# Altium PCB PCI Express_16765X6890_64PIN_Low profile_Clear.PCBDOC (part 9 of 9)
Units mm, origin at the board's own origin, x right, y up, seen from the top; angles counter-clockwise.
Board outline 80.71 x 137.84 mm, 6 copper layers (Top Layer, Layer 2 (GND), Layer 3, Layer 4, Layer 5 (AGND), Bottom Layer), stack 1.571 mm thick; 507 components, 297 nets, 1544 pads, 616 vias.
Unrouted connection lines stored in the file: 101.
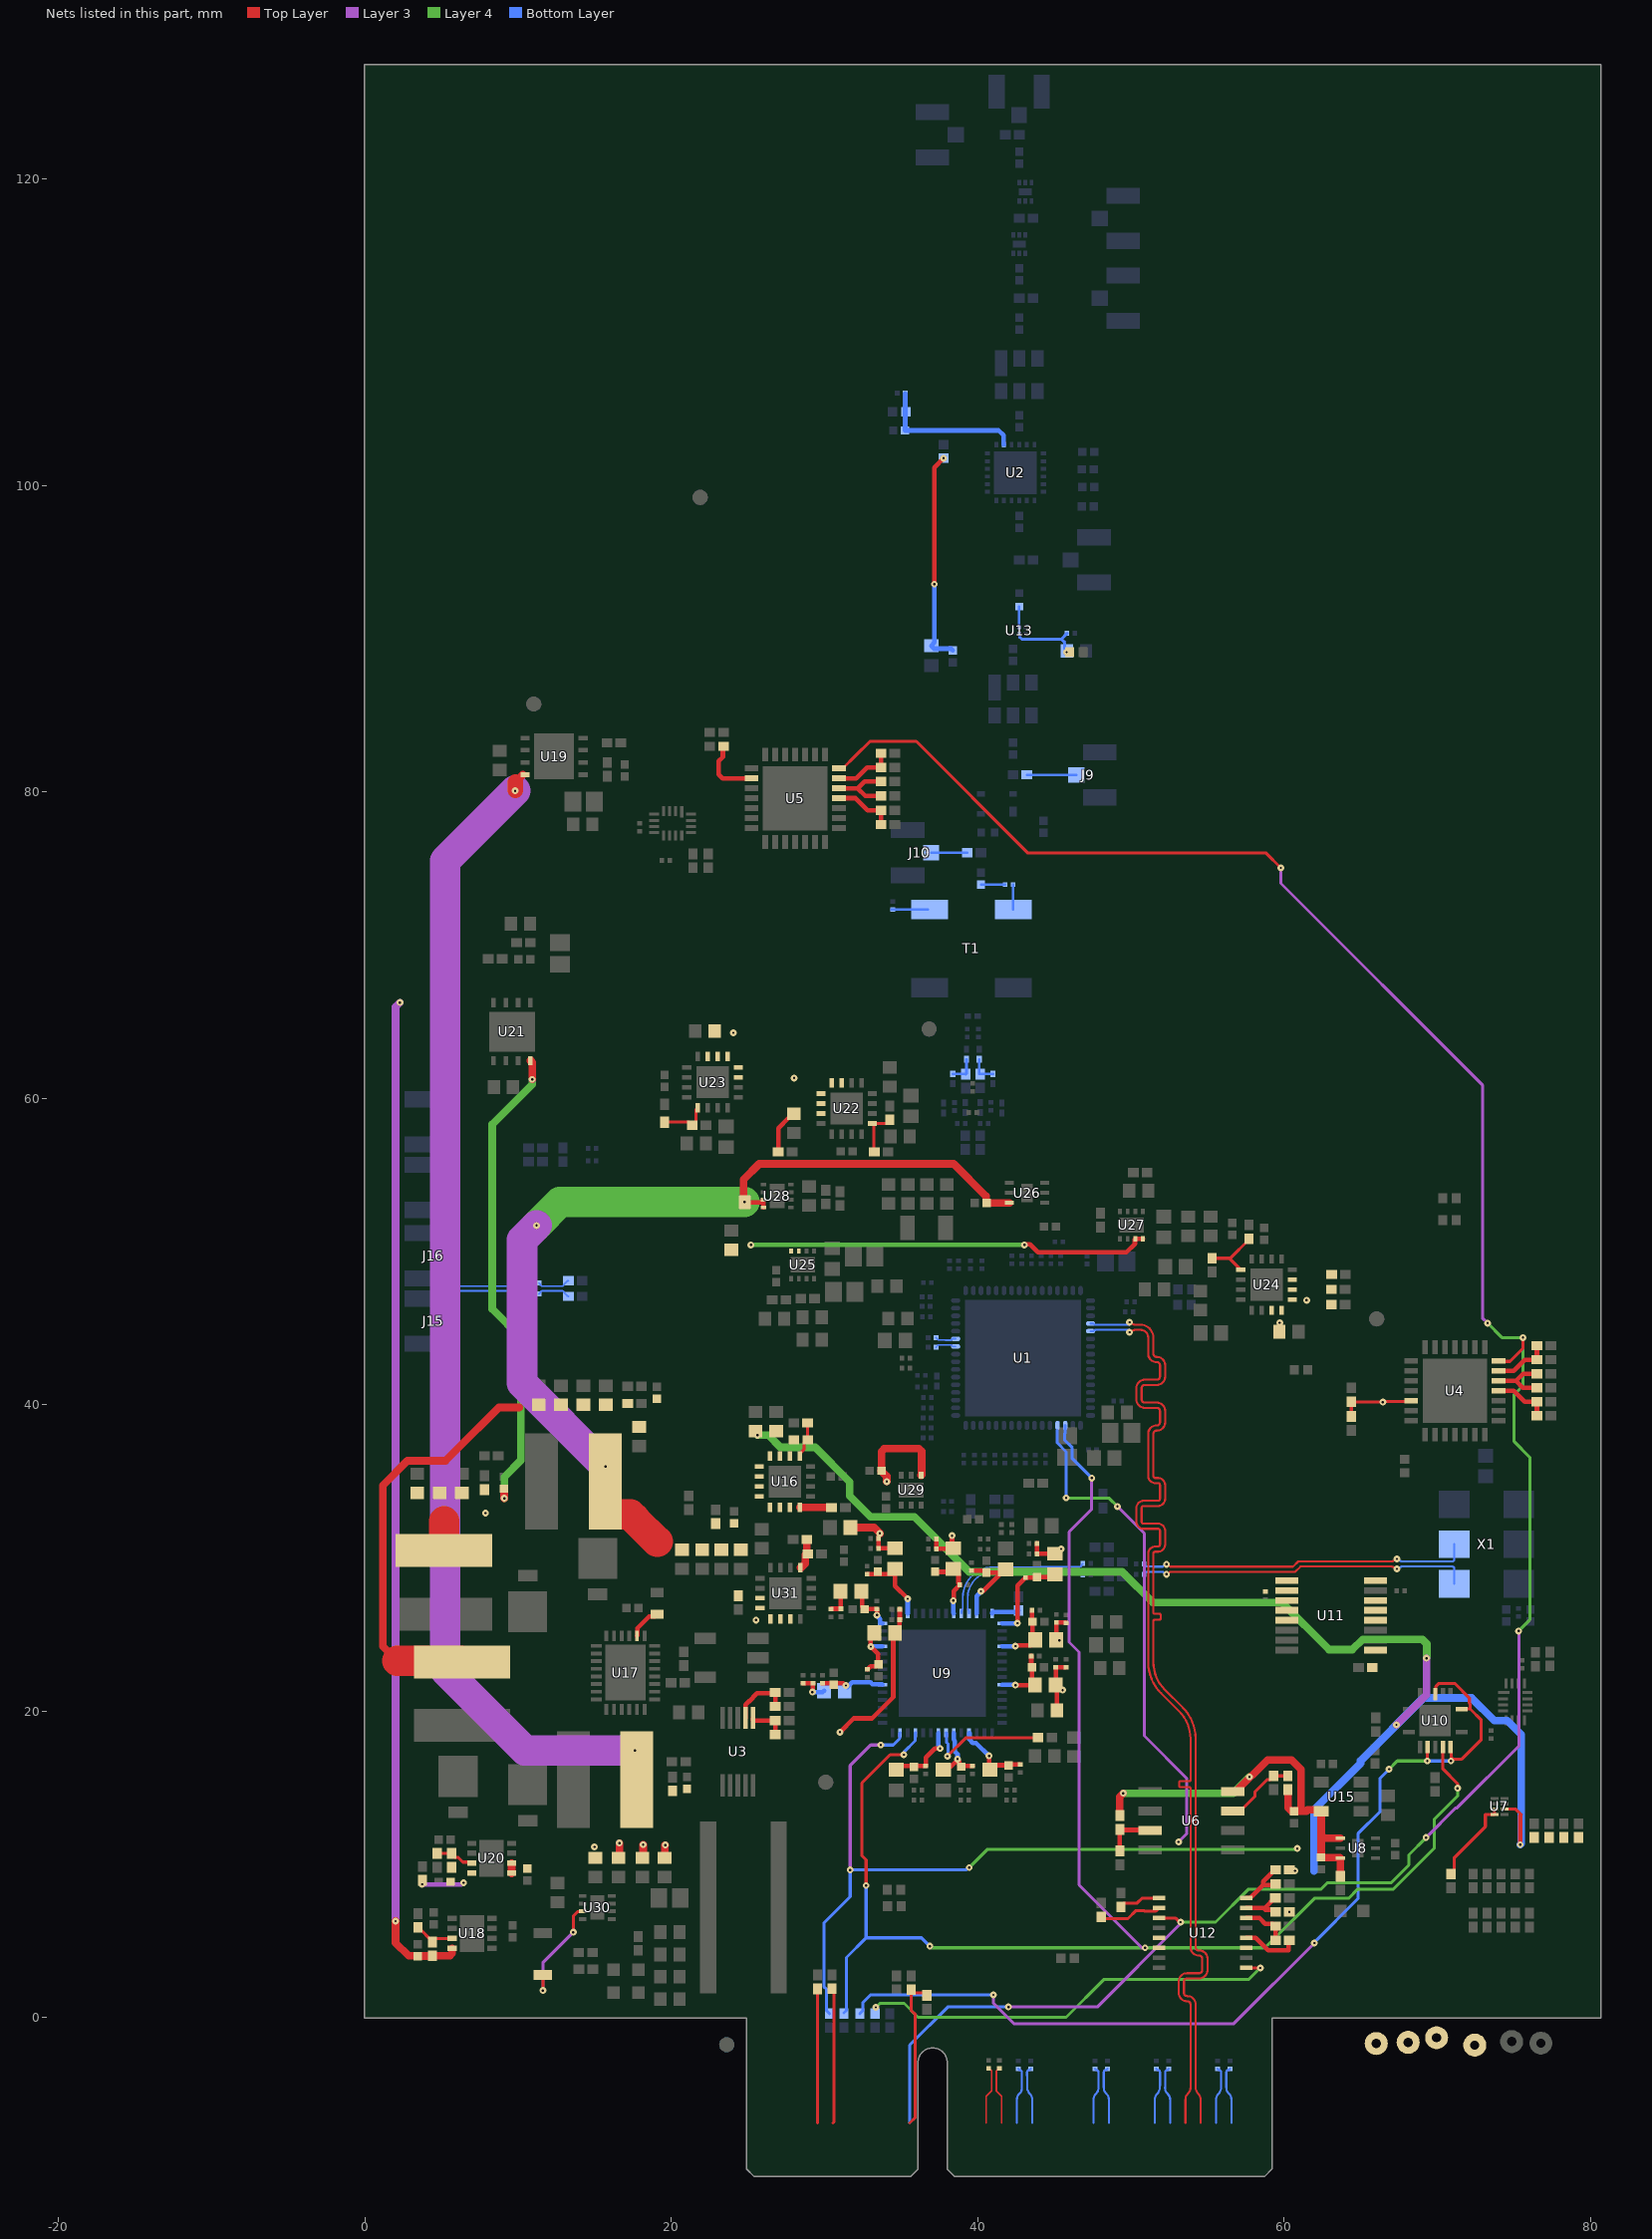
[diagram p7: the nets of this part, all layers, seen from the top]

## Via types
v1: diameter 0.45, hole 0.15, Top Layer to Bottom Layer, 469 vias
v2: diameter 0.5, hole 0.2, Top Layer to Bottom Layer, 128 vias
v3: diameter 0.475, hole 0.15, Top Layer to Bottom Layer, 15 vias
v4: diameter 5, hole 3, Top Layer to Bottom Layer, 3 vias
v5: diameter 0.6, hole 0.2, Top Layer to Bottom Layer, 1 vias

## Nets (pads, with @x,y where several pads share a name; then routed paths per layer and width w, separated by ;. In a path a pad name is that pad's centre, name@x,y a point inside that pad or via, vN(x,y) a via of type N, cw(c..) or ccw(c..) an arc to the next point about the centre after c; other vN are vias at no path point) (continued)
NetJ9_2: J9.2 R44.1 | length 3.2
  Bottom Layer w0.165: R44.1@43.209,81.102 J9.2@46.442,81.102
NetJ10_2: J10.2 R49.1 | length 2.4
  Bottom Layer w0.165: J10.2@36.965,76.022 R49.1@39.317,76.022
NetL1_1: L1.1 U13.5 | length 1.3
  Bottom Layer w0.165: U13.5@42.709,90.736 L1.1@42.709,92.075
NetL4_2: L4.2 U17.24 | length 2.2
  Top Layer w0.3: U17.24@17.76,24.905 17.785,24.93 17.785,25.405 18.555,26.175 18.917,26.175 L4.2@19.067,26.325
NetL9_1: L9.1 U30.7 | length 7.4
  Top Layer w0.2: v1(11.619,1.754) 11.619,2.64 L9.1@11.654,2.674 ; v1(13.605,5.561) 13.605,6.615 13.89,6.9 14.189,6.9 U30.7@14.214,6.925
  Layer 3 w0.2: v1(11.619,1.754) 11.619,3.576 v1(13.605,5.561)
NetR1_2: R1.2 R2.1 R5.2 | length 1.9
  Bottom Layer w0.165: R5.2@38.379,61.59 39.19,61.59 cw(c39.19,61.562) R2.1@39.218,61.562 ccw(c39.218,61.613) 39.268,61.613 R1.2@39.268,62.54
NetR9_1: R9.1 R10.2 R11.1 | length 1.8
  Bottom Layer w0.165: R10.2@40.107,62.54 40.107,61.62 ccw(c40.157,61.62) R11.1@40.157,61.57 cw(c40.178,61.57) 40.178,61.59 R9.1@40.996,61.59
NetR16_1: R16.1 U7.7 U7.8 | length 5.7
  Top Layer w0.2: R16.1@70.891,9.365 71.091,9.565 71.091,10.407 73.138,12.453 73.138,13.245 U7.8@73.727,13.245 U7.7@73.727,13.545
NetR20_2: R20.2 R27.1 U6.7 | length 4.7
  Top Layer w0.2: U6.7@56.652,13.474 57.127,13.474 58.106,14.453 58.106,14.737 58.885,15.516 59.109,15.516 59.309,15.716 R20.2@59.309,15.766 R27.1@60.249,15.766
NetR21_1: R21.1 R119.2 U6.3 | length 3.4
  Top Layer w0.3: R119.2@49.276,10.864 R21.1@49.276,12.275 49.312,12.24 51.216,12.24 U6.3@51.252,12.204
NetR30_2: R30.2 U5.23 | length 4.3
  Top Layer w0.2: R30.2@23.412,82.956 R30.2@23.441,82.986
  Top Layer w0.3: R30.2@23.412,82.956 23.368,82.913 23.368,82.271 23.089,81.991 23.089,81.128 23.339,80.878 U5.23@25.234,80.878
NetR50_1: R50.1 R51.2 U16.9 | length 2.4
  Top Layer w0.2: U16.9@28.383,36.646 28.383,36.796 28.655,37.068 28.655,37.494 28.855,37.694 R50.1@28.905,37.694 28.905,38.804 R51.2@28.898,38.811
NetR65_1: R65.1 R66.2 U22.9 | length 3.2
  Top Layer w0.2: R66.2@33.245,56.499 33.214,56.529 33.214,58.249 U22.9@33.114,58.349 34.029,58.349 R65.1@34.27,58.59
NetR67_1: R67.1 R68.2 U23.9 | length 3.2
  Top Layer w0.2: R68.2@19.562,58.438 19.565,58.435 21.165,58.435 R67.1@21.365,58.235 21.415,58.235 21.615,58.435 21.615,59.264 U23.9@21.717,59.366
NetR69_1: R69.1 R70.2 U24.9 | length 4
  Top Layer w0.2: R69.1@55.296,49.548 56.432,49.548 ; U24.9@57.177,48.803 56.432,49.548 ; R70.2@57.709,50.825 57.709,50.775 56.482,49.548 56.432,49.548
NetR77_2: R77.2 U9.42 | length 1.8
  Bottom Layer w0.3: U9.42@40.937,26.372 40.937,26.435 40.967,26.465 42.579,26.465 R77.2@42.672,26.557
NetR78_2: R78.2 U9.7 | length 8
  Top Layer w0.2: v1(38.024,17.043) 39.243,18.263 R78.2@43.942,18.263
  Bottom Layer w0.2: U9.7@37.937,18.572 37.957,18.552 37.957,17.976 38.066,17.866 38.066,17.086 v1(38.024,17.043)
NetR80_1: R80.1 R81.2 U18.7 | length 2.7
  Top Layer w0.2: R81.2@3.459,5.877 3.494,5.877 4.4,4.97 R80.1@4.4,4.954 ; R80.1@4.4,4.92 R80.1@4.4,4.954 ; U18.7@5.701,5.154 4.6,5.154 R80.1@4.4,4.954
NetR82_1: R82.1 R85.2 U20.7 | length 2.6
  Top Layer w0.2: R85.2@4.713,10.7 R82.1@5.658,10.7 5.658,10.65 5.858,10.45 6.083,10.45 6.396,10.137 6.899,10.137 U20.7@6.974,10.062
NetR86_1: R86.1 R88.2 U31.9 | length 2.1
  Top Layer w0.5: U31.9@28.432,29.361 28.482,29.361 28.754,29.633 28.754,30.201 28.804,30.251 28.854,30.251 28.851,30.255 28.851,31.188 R86.1@28.847,31.191
NetR111_2: R111.2 R129.1 U3.2 | length 4.1
  Top Layer w0.3: U3.2@24.845,19.548 24.845,20.418 25.05,20.623 25.068,20.623 25.603,21.158 26.735,21.158 R129.1@26.786,21.209 R111.2@26.786,20.295
NetR112_2: R112.2 R130.1 U3.1 | length 2.5
  Top Layer w0.3: U3.1@25.345,19.548 25.345,19.38 R130.1@26.786,19.38 R112.2@26.786,18.466
NetR113_1: R113.1 R118.2 U4.12 | length 4.3
  Top Layer w0.3: U4.12@73.995,41.544 75.134,41.544 ; R118.2@76.505,41.097 75.581,41.097 75.134,41.544 ; R113.1@76.505,42.012 75.602,42.012 75.134,41.544
NetR114_1: R114.1 R116.2 U4.13 | length 3.7
  Top Layer w0.3: U4.13@73.995,42.194 74.992,42.194 75.705,42.907 76.486,42.907 R116.2@76.505,42.926 R114.1@76.505,43.84
NetR115_1: R115.1 R117.2 U4.11 | length 3.7
  Top Layer w0.3: U4.11@73.995,40.894 75.002,40.894 75.705,40.191 76.496,40.191 R115.1@76.505,40.183 R117.2@76.505,39.268
NetR120_2: R120.2 R123.1 U5.11 | length 4
  Top Layer w0.3: U5.11@30.934,79.578 32.025,79.578 32.812,78.791 R120.2@33.688,78.791 R123.1@33.688,77.851
NetR121_2: R121.2 R125.1 U5.12 | length 4.7
  Top Layer w0.3: U5.12@30.934,80.228 32.17,80.228 ; R125.1@33.688,79.731 32.667,79.731 32.17,80.228 ; R121.2@33.688,80.67 32.613,80.67 32.17,80.228
NetR122_2: R122.2 R124.1 U5.13 | length 4
  Top Layer w0.3: U5.13@30.934,80.878 32.065,80.878 32.772,81.585 R124.1@33.688,81.585 R122.2@33.688,82.499
NetR136_1: R136.1 R137.2 U4.26 | length 4.9
  Top Layer w0.2: R137.2@64.389,39.218 R136.1@64.389,40.19 64.422,40.157 v1(66.446,40.157) 66.49,40.201 68.252,40.201 U4.26@68.295,40.244
NetR138_1: R138.1 R143.2 U12.14 | length 3.1
  Top Layer w0.3: U12.14@57.536,6.487 58.386,6.487 58.754,6.119 59.293,6.119 R143.2@59.443,5.969 R138.1@59.443,5.029
NetR139_1: R139.1 R142.2 U12.15 | length 3.1
  Top Layer w0.3: U12.15@57.536,7.137 58.649,7.137 58.753,7.033 ; R142.2@59.436,7.798 59.386,7.798 58.753,7.164 58.753,7.033 ; R139.1@59.443,6.883 59.293,7.033 58.753,7.033
NetR140_1: R140.1 R141.2 U12.16 | length 3.6
  Top Layer w0.3: U12.16@57.536,7.787 57.786,7.787 58.643,8.644 ; R141.2@59.443,8.712 59.375,8.644 58.643,8.644 ; R140.1@59.443,9.627 59.393,9.627 58.643,8.877 58.643,8.644
NetR144_2: R144.2 U12.1 | length 2.8
  Top Layer w0.2: R144.2@49.341,7.219 49.341,7.269 49.541,7.469 50.405,7.469 50.722,7.787 U12.1@51.836,7.787
NetR145_1: R145.1 U11.9
NetR147_2: R147.2 U12.2 | length 4.1
  Top Layer w0.2: R147.2@48.031,6.452 49.809,6.452 50.334,6.977 50.84,6.977 50.879,6.937 51.636,6.937 U12.2@51.836,7.137
O1_N: C185.2 U1.59 | length 1.4
  Bottom Layer w0.112: C185.2@37.287,44.374 37.287,44.364 37.438,44.213 37.891,44.213 37.906,44.198 38.268,44.198 38.362,44.292 U1.59@38.563,44.292
O1_P: C183.2 U1.58 | length 1.4
  Bottom Layer w0.112: C183.2@37.287,43.739 37.287,43.749 37.438,43.9 37.761,43.9 37.776,43.885 38.268,43.885 38.362,43.792 U1.58@38.563,43.792
O2_N: C187.2 | length 3.8
  Top Layer w0.112: 41.215,-4.62 41.215,-4.795 41.559,-5.138 41.559,-6.888 ; 41.215,-4.619 41.215,-3.493 41.281,-3.427 41.308,-3.427 C187.2@41.402,-3.333
O2_P: C186.2 | length 3.8
  Top Layer w0.112: 40.559,-6.888 40.559,-5.138 40.903,-4.795 40.903,-4.49 ; C186.2@40.716,-3.333 40.81,-3.427 40.837,-3.427 40.903,-3.493 40.903,-4.49
O5_N: C228.1 R98.2 | length 2.2
  Bottom Layer w0.112: C228.1@11.366,47.93 11.446,47.85 cw(c11.412,47.816) 11.46,47.816 ccw(c11.508,47.816) 11.474,47.782 ccw(c11.599,47.907) 11.599,47.73 12.878,47.73 ccw(c12.878,47.843) 12.957,47.763 12.976,47.781 ccw(c12.94,47.817) 12.99,47.817 cw(c13.041,47.817) 13.005,47.853 13.199,48.047 cw(c13.284,47.961) R98.2@13.284,48.082
O5_P: C227.1 R97.2 | length 2.2
  Bottom Layer w0.112: C227.1@11.366,47.219 11.446,47.298 ccw(c11.412,47.332) 11.46,47.332 cw(c11.508,47.332) 11.474,47.366 cw(c11.599,47.241) 11.599,47.418 12.878,47.418 cw(c12.878,47.305) 12.957,47.385 12.976,47.367 cw(c12.94,47.331) 12.99,47.331 ccw(c13.041,47.331) 13.005,47.295 13.199,47.102 ccw(c13.284,47.187) R97.2@13.284,47.066
O5P_N: C228.2 J16.2 | length 7.7
  Bottom Layer w0.112: J16.2@5.207,49.708 5.207,47.843 ccw(c5.319,47.843) 5.24,47.763 ccw(c5.319,47.843) 5.319,47.73 10.64,47.73 ccw(c10.64,47.843) 10.719,47.763 10.738,47.782 ccw(c10.704,47.816) 10.752,47.816 cw(c10.8,47.816) 10.766,47.85 C228.2@10.846,47.93
O5P_P: C227.2 J15.2 | length 7.7
  Bottom Layer w0.112: J15.2@5.207,45.441 5.207,47.305 cw(c5.319,47.305) 5.24,47.385 cw(c5.319,47.305) 5.319,47.418 10.64,47.418 cw(c10.64,47.305) 10.719,47.385 10.738,47.366 cw(c10.704,47.332) 10.752,47.332 ccw(c10.8,47.332) 10.766,47.298 C227.2@10.846,47.219
OSCIN_N: C179.2 U9.38 | length 10.1
  Bottom Layer w0.112: U9.38@38.937,26.372 38.937,26.486 cw(c39.097,26.486) 38.983,26.599 ccw(c38.87,26.712) 39.03,26.712 39.03,26.97 39.032,26.972 39.032,27.407 cw(c41.021,27.407) 41.021,29.395 44.09,29.395 cw(c44.129,29.356) 44.129,29.412 46.661,29.412 ccw(c46.661,29.524) 46.741,29.445 46.755,29.459 ccw(c46.711,29.504) 46.774,29.504 cw(c46.837,29.504) 46.792,29.548 C179.2@46.868,29.624
OSCIN_P: C176.2 U9.39 | length 9.7
  Bottom Layer w0.112: U9.39@39.437,26.372 39.437,26.486 ccw(c39.277,26.486) 39.39,26.599 cw(c39.503,26.712) 39.343,26.712 39.343,26.841 39.345,26.842 39.345,27.407 cw(c41.021,27.407) 41.021,29.083 44.238,29.083 cw(c44.277,29.044) 44.277,29.099 46.661,29.099 cw(c46.661,28.987) 46.741,29.066 46.755,29.052 cw(c46.711,29.007) 46.774,29.007 ccw(c46.837,29.007) 46.792,28.962 C176.2@46.868,28.887
PER0_N: C235.2 | length 3.7
  Bottom Layer w0.138: C235.2@43.459,-3.359 43.405,-3.413 cw(c43.34,-3.348) 43.34,-3.44 ccw(c43.34,-3.532) 43.276,-3.467 43.262,-3.48 ccw(c43.359,-3.578) 43.222,-3.578 43.222,-3.794 43.228,-3.8 43.228,-4.573 ccw(c43.793,-4.573) 43.393,-4.973 cw(c42.993,-5.373) 43.559,-5.373 43.559,-6.888
PER0_P: C236.2 | length 3.8
  Bottom Layer w0.138: 42.559,-6.888 42.559,-5.373 cw(c43.124,-5.373) 42.724,-4.973 42.742,-4.955 ; C236.2@42.647,-3.359 42.701,-3.413 ccw(c42.766,-3.348) 42.766,-3.44 cw(c42.766,-3.532) 42.83,-3.467 42.844,-3.48 cw(c42.747,-3.578) 42.884,-3.578 42.884,-3.934 42.89,-3.94 42.89,-4.598 cw(c42.386,-4.598) 42.743,-4.955
PER1_N: C233.2 | length 3.7
  Bottom Layer w0.138: C233.2@48.463,-3.359 48.409,-3.413 cw(c48.344,-3.348) 48.344,-3.44 ccw(c48.344,-3.532) 48.28,-3.467 48.266,-3.48 ccw(c48.363,-3.578) 48.226,-3.578 48.226,-3.796 48.228,-3.798 48.228,-4.573 ccw(c48.793,-4.573) 48.393,-4.973 cw(c47.993,-5.373) 48.559,-5.373 48.559,-6.888
PER1_P: C234.2 | length 3.8
  Bottom Layer w0.138: 47.559,-6.888 47.559,-5.373 cw(c48.124,-5.373) 47.724,-4.973 47.742,-4.955 ; C234.2@47.65,-3.359 47.705,-3.413 ccw(c47.77,-3.348) 47.77,-3.44 cw(c47.77,-3.532) 47.834,-3.467 47.848,-3.48 cw(c47.75,-3.578) 47.888,-3.578 47.888,-3.936 47.89,-3.938 47.89,-4.598 cw(c47.386,-4.598) 47.743,-4.955
PER2_N: C17.2 | length 3.7
  Bottom Layer w0.138: C17.2@52.476,-3.359 52.422,-3.413 cw(c52.357,-3.348) 52.357,-3.44 ccw(c52.357,-3.532) 52.293,-3.467 ccw(c52.422,-3.597) 52.239,-3.597 52.239,-4.571 ccw(c52.266,-4.598) 52.228,-4.598 ccw(c52.733,-4.598) 52.376,-4.955 cw(c51.933,-5.398) 52.559,-5.398 52.559,-6.888
PER2_P: C18.2 | length 3.7
  Bottom Layer w0.138: 51.559,-6.888 51.559,-5.373 cw(c52.124,-5.373) 51.724,-4.973 ccw(c51.325,-4.573) 51.89,-4.573 51.89,-4.458 cw(c51.928,-4.458) 51.901,-4.431 51.901,-3.597 ccw(c51.718,-3.597) 51.847,-3.467 ccw(c51.783,-3.532) 51.783,-3.44 cw(c51.783,-3.348) 51.718,-3.413 C18.2@51.664,-3.359
PER3_N: C15.2 | length 3.8
  Bottom Layer w0.138: C15.2@56.464,-3.353 56.41,-3.407 cw(c56.345,-3.343) 56.345,-3.434 ccw(c56.345,-3.526) 56.28,-3.461 ccw(c56.41,-3.591) 56.227,-3.591 56.227,-4.249 56.228,-4.25 56.228,-4.573 ccw(c56.793,-4.573) 56.393,-4.973 cw(c55.993,-5.373) 56.559,-5.373 56.559,-6.888
PER3_P: C16.2 | length 3.8
  Bottom Layer w0.138: 55.559,-6.888 55.559,-5.373 cw(c56.124,-5.373) 55.724,-4.973 ccw(c55.325,-4.573) 55.89,-4.573 55.89,-4.389 55.889,-4.388 55.889,-3.591 ccw(c55.705,-3.591) 55.835,-3.461 ccw(c55.771,-3.526) 55.771,-3.434 cw(c55.771,-3.343) 55.706,-3.407 C16.2@55.651,-3.353
PERST#: U4.14 U5.14 U12.3 | length 156.2
  Top Layer w0.2: U5.14@30.934,81.528 31.199,81.528 32.029,82.358 32.04,82.358 32.969,83.287 35.992,83.287 43.282,75.997 58.826,75.997 v1(59.792,75.032) ; U12.3@51.836,6.487 52.907,6.487 53.171,6.223 v1(53.238,6.223) ; U4.14@73.995,42.844 74.018,42.822 74.749,42.822 75.59,43.663 v1(75.59,44.374)
  Layer 3 w0.2: v1(42.012,0.686) 47.809,0.686 53.191,6.068 53.191,6.175 v1(53.238,6.223) ; v1(59.792,75.032) 59.792,74.016 72.949,60.858 72.949,45.644 v1(73.279,45.314) ; v1(69.266,11.735) 71.205,13.674 71.287,13.674 75.328,17.715 75.328,25.205 v1(75.311,25.222)
  Layer 4 w0.2: v1(53.238,6.223) 55.524,6.223 57.658,8.357 62.389,8.357 62.813,8.78 66.977,8.78 68.144,9.947 68.144,10.613 v1(69.266,11.735) ; v1(73.279,45.314) 74.219,44.374 v1(75.59,44.374) 75.59,41.236 75.015,40.66 75.015,37.589 76.039,36.565 76.039,25.95 v1(75.311,25.222)
  Bottom Layer w0.2: 35.559,-6.888 35.559,-1.805 38.049,0.686 v1(42.012,0.686)
PET1_N: 
PET1_P: 
PET2_N: 
PET2_P: 
PET3_N: U1.20 | length 66.8
  Top Layer w0.138: v1(49.911,45.367) cw(c49.911,45.172) 50.049,45.31 ccw(c50.288,45.549) 50.288,45.21 50.622,45.21 cw(c50.622,44.365) 51.468,44.365 51.468,43.315 ccw(c51.672,43.315) 51.672,43.111 ; 51.672,38.3 ccw(c51.672,38.096) 51.468,38.096 51.468,35.341 ccw(c51.597,35.341) 51.597,35.212 51.769,35.212 cw(c51.769,34.745) 52.236,34.745 52.236,33.85 cw(c51.769,33.85) 51.769,33.383 50.829,33.383 ccw(c50.829,33.254) 50.7,33.254 50.7,32.359 ccw(c50.829,32.359) 50.829,32.23 51.769,32.23 cw(c51.769,31.763) 52.236,31.763 52.236,30.868 cw(c51.769,30.868) 51.769,30.401 51.597,30.401 ccw(c51.597,30.271) 51.468,30.271 51.468,26.543 51.468,26.426 ccw(c51.546,26.426) 51.546,26.347 51.86,26.347 cw(c51.86,26.269) 51.938,26.269 51.938,26.034 cw(c51.86,26.034) 51.86,25.956 51.546,25.956 ccw(c51.546,25.877) 51.468,25.877 51.468,24.384 51.468,23.194 ccw(c54.008,23.194) 52.212,21.397 53.388,20.222 cw(c51.36,18.194) 54.228,18.194 54.228,4.58 ccw(c54.432,4.58) 54.432,4.376 ; 51.694,38.3 ccw(c51.694,38.842) 52.236,38.842 52.236,39.587 ccw(c51.694,39.587) 51.694,40.129 50.904,40.129 cw(c50.904,40.333) 50.7,40.333 50.7,41.079 cw(c50.904,41.079) 50.904,41.283 51.694,41.283 ccw(c51.694,41.824) 52.236,41.824 52.236,42.57 ccw(c51.694,42.57) 51.694,43.111 ; 53.663,1.394 cw(c53.663,1.598) 53.459,1.598 53.459,2.344 cw(c53.663,2.344) 53.663,2.548 54.454,2.548 ccw(c54.454,3.089) 54.996,3.089 54.996,3.835 ccw(c54.454,3.835) 54.454,4.376 ; 53.686,1.394 cw(c53.686,0.852) 54.228,0.852 54.228,-4.573 ccw(c54.793,-4.573) 54.393,-4.973 cw(c53.993,-5.373) 54.559,-5.373 54.559,-6.888
  Bottom Layer w0.138: U1.20@47.363,45.292 47.499,45.292 cw(c47.499,45.153) 47.597,45.251 ccw(c47.695,45.349) 47.695,45.21 49.868,45.21 ccw(c49.868,45.254) 49.898,45.223 ccw(c49.868,45.254) 49.911,45.254 v1(49.911,45.367)
PET3_P: U1.21 | length 66.8
  Top Layer w0.138: v1(49.911,44.717) ccw(c49.911,44.911) 50.049,44.774 cw(c50.288,44.534) 50.288,44.873 50.622,44.873 cw(c50.622,44.365) 51.13,44.365 51.13,43.315 ccw(c51.672,43.315) 51.672,42.774 ; 51.672,38.638 ccw(c51.672,38.096) 51.13,38.096 51.13,35.341 ccw(c51.597,35.341) 51.597,34.874 51.769,34.874 cw(c51.769,34.745) 51.898,34.745 51.898,33.85 cw(c51.769,33.85) 51.769,33.721 50.829,33.721 ccw(c50.829,33.254) 50.362,33.254 50.362,32.359 ccw(c50.829,32.359) 50.829,31.892 51.769,31.892 cw(c51.769,31.763) 51.898,31.763 51.898,30.868 cw(c51.769,30.868) 51.769,30.738 51.597,30.738 ccw(c51.597,30.271) 51.13,30.271 51.13,23.192 ccw(c54.005,23.192) 51.972,21.16 53.146,19.986 cw(c51.35,18.19) 53.89,18.19 53.89,15.672 53.89,15.499 cw(c53.812,15.499) 53.812,15.421 53.233,15.421 ccw(c53.233,15.343) 53.154,15.343 53.154,15.108 ccw(c53.233,15.108) 53.233,15.029 53.812,15.029 cw(c53.812,14.951) 53.89,14.951 53.89,14.834 53.89,4.58 ccw(c54.432,4.58) 54.432,4.039 ; 51.694,38.638 ccw(c51.694,38.842) 51.898,38.842 51.898,39.587 ccw(c51.694,39.587) 51.694,39.791 50.904,39.791 cw(c50.904,40.333) 50.362,40.333 50.362,41.079 cw(c50.904,41.079) 50.904,41.62 51.694,41.62 ccw(c51.694,41.824) 51.898,41.824 51.898,42.57 ccw(c51.694,42.57) 51.694,42.774 ; 53.559,-6.888 53.559,-5.373 cw(c54.124,-5.373) 53.724,-4.973 ccw(c53.325,-4.573) 53.89,-4.573 53.89,0.852 ccw(c53.686,0.852) 53.686,1.056 ; 53.663,1.056 cw(c53.663,1.598) 53.122,1.598 53.122,2.344 cw(c53.663,2.344) 53.663,2.885 54.454,2.885 ccw(c54.454,3.089) 54.658,3.089 54.658,3.835 ccw(c54.454,3.835) 54.454,4.039
  Bottom Layer w0.138: U1.21@47.363,44.792 47.499,44.792 ccw(c47.499,44.93) 47.597,44.832 cw(c47.695,44.734) 47.695,44.873 49.868,44.873 cw(c49.868,44.829) 49.898,44.86 cw(c49.868,44.829) 49.911,44.829 v1(49.911,44.717)
SC18_INT: R105.2 U12.9 | length 27.8
  Top Layer w0.2: U12.9@57.536,3.237 57.542,3.231 58.44,3.231 v1(58.445,3.226)
  Layer 4 w0.2: v1(33.35,0.66) 33.373,0.66 33.627,0.914 35.199,0.914 36.105,0.008 45.77,0.008 48.251,2.489 57.455,2.489 57.709,2.489 v1(58.445,3.226)
SMCLK: R47.1 | length 8.8
  Top Layer w0.2: R47.1@29.54,1.865 29.54,-6.87 29.559,-6.888
SMDAT: R45.1 | length 8.8
  Top Layer w0.2: R45.1@30.48,1.872 30.615,1.737 30.615,-6.832 30.559,-6.888
SPI_CLK: R36.2 U1.36 U9.13 U11.14 | length 83.4
  Layer 3 w0.2: v1(31.674,9.627) 31.674,16.44 33.014,17.78 v1(33.68,17.78) ; v1(49.124,33.35) 50.876,31.598 50.876,18.38 53.645,15.611 53.645,11.989 v1(53.111,11.455)
  Layer 4 w0.2: v1(39.446,9.779) 40.648,10.981 60.816,10.981 v1(60.858,11.024) ; v1(45.771,33.909) 45.8,33.879 48.594,33.879 v1(49.124,33.35)
  Bottom Layer w0.2: R36.2@30.328,0.247 30.128,0.447 30.128,1.846 29.955,2.018 29.955,6.155 31.674,7.874 v1(31.674,9.627) 39.226,9.627 39.379,9.779 v1(39.446,9.779) ; v1(33.68,17.78) 34.489,17.78 34.917,18.208 34.917,18.552 U9.13@34.937,18.572 ; 45.194,38.312 45.194,37.497 45.771,36.92 v1(45.771,33.909)
SPI_CLK_SCI: TP4.1 U11.3 U12.11
SPI_MISO: R104.2 TP3.1 U10.3 U10.6 U10.8 U10.11 U11.12 | length 62.5
  Top Layer w0.2: v1(69.342,16.739) 69.355,16.751 69.355,17.642 U10.3@69.367,17.654 ; U10.11@69.867,21.104 69.907,21.144 69.907,21.609 70.103,21.804 71.131,21.804 72.095,20.84 72.095,20.516 72.146,20.466 72.146,20.142 ; U10.6@70.867,17.654 70.907,17.614 70.907,16.977 v1@71.018,16.866 ; v1(70.891,16.739) v1@71.018,16.866 ; U10.8@71.592,20.129 71.605,20.142 72.146,20.142 ; v1@71.018,16.866 71.603,16.866 72.873,18.136 72.873,19.415 72.146,20.142
  Layer 3 w0.2: v1(41.021,1.473) 41.021,0.934 42.361,-0.406 56.718,-0.406 v1(61.976,4.851)
  Layer 4 w0.2: v1(66.853,16.205) 67.386,16.739 v1(69.342,16.739)
  Bottom Layer w0.2: R104.2@32.309,0.247 32.509,0.447 32.509,0.973 33.009,1.473 v1(41.021,1.473) ; v1(61.976,4.851) 61.976,4.902 64.821,7.747 64.821,11.989 66.269,13.437 66.269,15.621 v1(66.853,16.205) ; v1(69.342,16.739) v1(70.891,16.739)
SPI_MISO_SCI: TP6.1 U11.5 U12.5
SPI_MOSI: R48.2 U1.35 U9.11 U10.5 U11.13 | length 106.3
  Top Layer w0.2: v1(32.715,8.611) 32.715,10.281 32.444,10.552 32.444,15.304 34.286,17.145 v1(35.179,17.145) ; v1(50.927,4.547) v1@50.932,4.542 ; U10.5@70.366,17.654 70.366,16.215 71.323,15.258 v1(71.323,14.961)
  Layer 3 w0.2: v1(47.447,35.204) 47.43,35.187 47.43,33.157 45.966,31.692 45.966,24.497 46.617,23.845 46.617,8.647 50.718,4.547 v1(50.927,4.547)
  Layer 4 w0.2: v1(36.881,4.648) 36.982,4.547 v1(50.927,4.547) 58.749,4.547 61.975,7.772 64.205,7.772 64.806,8.374 67.137,8.374 69.791,11.028 69.791,12.92 71.323,14.453 v1(71.323,14.961)
  Bottom Layer w0.2: R48.2@31.267,0.297 31.428,0.458 31.428,3.91 32.715,5.197 ; v1(32.715,8.611) 32.715,5.197 ; v1(35.179,17.145) 35.179,17.323 35.917,18.06 35.917,18.552 U9.11@35.937,18.572 ; v1(36.881,4.648) 36.332,5.197 32.715,5.197 ; U1.35@45.713,38.642 45.694,38.622 45.694,38.13 45.678,38.114 45.678,37.679 46.171,37.186 46.171,36.481 v1(47.447,35.204)
SPI_MOSI_SCI: TP5.1 U11.4 U12.6
Tor_RF_50: C19.1 C32.1 | length 1.6
  Bottom Layer w0.165: C32.1@40.217,73.941 C19.1@41.797,73.941
TorRF_50: C19.2 T1.1 | length 1.6
  Bottom Layer w0.165: T1.1@42.317,72.302 C19.2@42.317,73.941
TorRF_50_1: C20.2 T1.4 | length 2.4
  Bottom Layer w0.165: C20.2@34.365,72.302 T1.4@36.746,72.302
V2.5: C44.2 C45.2 C46.2 C47.2 C48.2 C112.2 C131.2 L3.2 R52.2 U25.7 U25.8 U27.7 U27.8 | length 53.5
  Top Layer w0.3: v1(43.053,50.419) 43.104,50.47 43.409,50.47 43.942,49.936 49.705,49.936 50.263,50.494 50.263,50.789 U27.7@50.288,50.814 U27.8@50.788,50.814
  Top Layer w0.5: 2.115,23.28 1.173,24.222 1.173,34.723 2.786,36.336 5.268,36.336 5.927,36.994 8.746,39.814 10.092,39.814
  Top Layer w2: 2.115,23.28 6.27,23.28 L3.2@6.345,23.205
  Layer 4 w0.3: v1(25.197,50.419) v1(43.053,50.419)
V3.6: C38.2 C50.2 C51.2 C52.2 C53.2 C94.2 C147.2 L5.2 R54.2 R102.2 U16.1 U16.2 U16.3 U16.4 U16.15 U16.16 U26.6 U28.7 U28.8 | length 63.3
  Top Layer w0.3: C147.2@24.803,53.199 25.843,53.199 ; U28.8@26.008,52.865 26.008,53.199 25.843,53.199 ; U28.7@26.008,53.365 25.843,53.199
  Top Layer w0.5: C147.2@24.803,53.199 24.714,53.288 24.714,54.686 25.743,55.715 38.428,55.715 40.548,53.595 40.548,53.189 40.568,53.169 C94.2@40.573,53.169 U26.6@42.069,53.169 ; U16.4@28.383,33.296 28.394,33.285 30.451,33.285 R102.2@30.462,33.274
  Top Layer w2: L5.2@15.68,34.987 15.68,32.912 15.755,32.837 17.332,32.837 17.65,32.518 17.65,32.481 19.068,31.063 19.105,31.063
  Layer 3 w2: v1(11.201,51.689) 10.262,50.749 10.262,41.4 v1(15.701,35.961)
  Layer 4 w2: v1(11.201,51.689) 12.741,53.228 v1(24.774,53.228)
V5.5: C61.2 C62.2 C63.2 C64.2 C65.2 C69.2 L7.2 R59.1 U19.4 U20.1 U20.2 | length 78.7
  Top Layer w0.3: v1(9.804,80.061) v1@9.833,80.089 ; U19.4@10.301,81.111 U19.4@10.451,81.111
  Top Layer w0.5: U20.1@9.574,9.412 U20.2@9.574,10.062 ; 9.833,80.642 U19.4@10.301,81.111 ; C64.2@16.551,10.414 16.612,10.474 v1(16.612,11.379) ; C63.2@18.114,10.414 18.161,10.461 v1(18.161,11.278) ; C62.2@19.554,10.414 19.583,10.443 19.583,11.227 v1(19.609,11.252)
  Top Layer w1: v1@9.833,80.089 9.833,80.642
  Layer 3 w2: v1(9.804,80.061) 5.232,75.489 5.232,22.657 10.465,17.424 v1(17.628,17.424)
  other v1: 14.986,11.125
V_LMK_1.8V: C158.2 C159.2 C162.2 C163.2 C181.2 C182.2 C191.2 C192.2 C199.2 C200.2 C203.2 C204.2 C211.2 C212.2 C215.2 C216.2 C220.2 FB17.1 FB18.1 FB20.1 FB22.1 FB24.1 FB25.1 FB27.1 FB28.1 FB30.2 | length 28.4
  Top Layer w0.3: C181.2@28.6,21.813 C182.2@29.251,21.813 ; v1(29.21,21.234) 29.239,21.263 29.239,21.79 29.251,21.803 C182.2@29.251,21.813 ; C182.2@29.261,21.813 C182.2@29.251,21.813 ; C211.2@30.429,26.67 30.439,26.67 30.445,26.676 C212.2@31.064,26.676 31.064,27.798 FB27.1@31.05,27.813 30.963,27.9 31.09,28.027 FB27.1@31.09,28.016 ; v1(31.013,18.618) 31.915,19.52 33.109,19.52 34.487,20.898 34.487,24.983 FB24.1@34.599,25.095 34.899,25.395 34.899,25.936 34.912,25.949 C200.2@34.912,25.959 C199.2@34.912,26.645 ; v1@33.63,31.582 33.536,31.489 C159.2@33.536,31.259 C158.2@33.536,30.622 FB17.1@34.607,30.622 ; C216.2@37.31,31.23 C215.2@37.31,30.583 38.361,30.583 FB28.1@38.4,30.622 38.329,30.694 v1(38.329,31.445) ; C163.2@43.874,30.937 C162.2@43.874,30.262 FB18.1@45.046,30.262 ; FB22.1@45.114,24.638 45.136,24.66 C192.2@45.136,25.775 45.741,25.775 45.761,25.756 C191.2@45.771,25.756 ; C220.2@45.161,20.041 45.161,21.629 FB25.1@45.093,21.698 C203.2@45.093,22.854 C204.2@45.768,22.854
  Top Layer w0.5: FB30.2@31.699,31.979 33.242,31.979 33.616,31.605 33.616,31.596 v1@33.63,31.582
  Bottom Layer w0.3: v1(29.21,21.234) 29.87,21.234 FB20.1@29.972,21.336
  other v1: 45.542,21.361 45.339,24.613 45.441,30.582 33.604,31.598
VCC: C34.2 C237.2 R21.2 R27.2 R132.2 U6.8 U8.4 U8.6 U15.5 | length 28.6
  Top Layer w0.5: R21.2@49.276,13.175 49.276,14.402 v1(49.505,14.63) ; U6.8@56.652,14.744 56.857,14.744 58.928,16.815 60.487,16.815 61.112,16.19 61.112,13.64 ; R27.2@60.199,14.816 R27.2@60.249,14.866 60.249,13.691 C34.2@60.494,13.446 ; C34.2@60.655,13.446 60.655,13.451 60.675,13.471 61.461,13.471 61.544,13.554 62.31,13.554 U15.5@62.417,13.447 ; U15.5@62.424,13.454 U15.5@62.417,13.447 ; U8.4@63.671,11.699 63.662,11.707 62.621,11.707 62.416,11.913 ; R132.2@63.678,9.213 63.678,10.392 U8.6@63.671,10.399 63.646,10.424 62.428,10.424 62.408,10.444 C237.2@62.408,10.448 62.416,10.456 62.416,11.913 ; 62.416,11.913 62.416,13.446 U15.5@62.417,13.447
  Layer 4 w0.5: v1(49.505,14.63) 56.667,14.63 v1(57.734,15.697)
VCC_2.8_LNA: C26.2 C27.2 FB1.2 U13.2 | length 4.5
  Bottom Layer w0.2: U13.2@42.709,90.329 42.734,90.304 42.734,90.1 42.881,89.954 45.46,89.954 ; C26.2@45.821,89.19 45.681,89.33 45.681,89.733 45.46,89.954 ; C27.2@45.827,90.331 45.827,90.321 45.46,89.954
  other v1: 45.808,89.103
VCC_5_ATT: C9.2 C10.2 FB2.2 U2.2 | length 9.6
  Bottom Layer w0.3: C9.2@35.265,106.006 35.265,103.583 C10.2@35.267,103.581 41.363,103.581 41.684,103.259 41.684,102.674 U2.2@41.709,102.649
VCC_AMP_5: C30.2 FB3.2 R46.2 | length 14.1
  Top Layer w0.3: v1(37.172,93.548) 37.172,101.166 v1(37.775,101.769)
  Bottom Layer w0.3: v1(37.172,93.548) 37.172,89.732 R46.2@36.965,89.524 37.15,89.339 38.262,89.339 38.382,89.219 C30.2@38.382,89.214
VCC_PCA: C35.2 C36.2 C243.1 R19.2 R37.2 R38.2 R50.2 R126.2 R138.2 R139.2 R140.2 U7.2 U11.1 U11.2 U11.16 U12.12 U16.10 U16.11 U16.12 U16.13 U16.14 | length 92.3
  Top Layer w0.2: U7.2@74.397,13.595 75.128,13.595 75.489,13.233
  Top Layer w0.3: U12.12@57.536,5.187 58.141,5.187 58.948,4.379 60.302,4.379 60.302,4.988 R138.2@60.343,5.029 ; v1(75.413,11.278) 75.413,13.157
  Layer 3 w0.5: v1(67.335,19.101) 69.291,21.057 v1(69.291,23.444)
  Layer 4 w0.5: v1(25.629,37.998) 26.34,37.998 27.127,37.211 29.388,37.211 31.648,34.95 31.648,34.047 33.02,32.675 35.865,32.675 39.457,29.083 49.428,29.083 51.435,27.076 59.853,27.076 62.916,24.014 64.463,24.014 65.127,24.678 69.024,24.678 69.317,24.385 69.317,23.47 v1(69.291,23.444)
  Bottom Layer w0.5: 61.951,9.55 61.951,13.553 64.988,16.59 64.988,16.753 69.088,20.853 72.238,20.853 73.723,19.368 74.576,19.368 75.478,18.466 75.478,11.343 v1(75.413,11.278)
  other v1: 60.343,6.883 60.706,9.576
VCXO_OUT_N: C178.1 X1.5 | length 21.8
  Top Layer w0.138: v1(52.324,29.577) 52.405,29.577 52.561,29.421 60.579,29.421 60.922,29.764 66.984,29.764 ccw(c66.984,30.103) 67.223,29.864 cw(c67.361,29.726) v1(67.361,29.921)
  Bottom Layer w0.138: C178.1@50.858,29.589 50.858,29.579 51.011,29.427 51.457,29.427 51.463,29.421 52.087,29.421 52.243,29.577 v1(52.324,29.577) ; v1(67.361,29.921) cw(c67.361,29.726) 67.498,29.864 67.519,29.842 ccw(c67.708,30.031) 67.708,29.764 70.973,29.764 ccw(c70.973,29.902) 71.071,29.805 ccw(c70.973,29.902) 71.111,29.902 X1.5@71.111,30.896
VCXO_OUT_P: C175.1 X1.4 | length 21.8
  Top Layer w0.138: v1(52.324,28.927) 52.405,28.927 52.561,29.083 60.718,29.083 61.062,29.427 66.984,29.427 cw(c66.984,29.088) 67.223,29.328 ccw(c67.361,29.465) v1(67.361,29.271)
  Bottom Layer w0.138: C175.1@50.858,28.927 50.858,28.937 51.011,29.09 51.317,29.09 51.323,29.083 52.087,29.083 52.243,28.927 v1(52.324,28.927) ; v1(67.361,29.271) ccw(c67.361,29.465) v1@67.498,29.327 ; v1@67.498,29.328 67.519,29.349 cw(c67.708,29.16) 67.708,29.427 70.973,29.427 cw(c70.973,29.289) 71.071,29.387 cw(c70.973,29.289) 71.111,29.289 X1.4@71.111,28.296
VDD_CORE: C152.2 C153.2 FB15.2 U9.8 | length 4.8
  Top Layer w0.3: FB15.2@34.681,16.166 34.941,16.426 C152.2@36.602,16.426 36.61,16.426 36.61,16.956 37.205,17.551 v1(37.541,17.551)
  Bottom Layer w0.3: U9.8@37.437,18.572 37.438,18.57 37.438,17.654 v1(37.541,17.551)
VDD_IO: C160.2 C161.2 FB17.2 U9.31 | length 5.1
  Top Layer w0.3: C160.2@32.782,28.944 FB17.2@34.607,28.944 ; FB17.2@34.607,29.272 FB17.2@34.607,28.944 ; v1(35.433,27.33) 34.607,28.156 FB17.2@34.607,28.944
  Bottom Layer w0.3: v1(35.433,27.33) 35.435,27.329 U9.31@35.437,26.372 U9.31@35.437,26.372
VDD_OSC: C217.2 C218.2 FB28.2 U9.37 | length 4.6
  Top Layer w0.3: C218.2@37.225,29.082 38.21,29.082 FB28.2@38.4,29.272 38.45,29.272 38.75,28.972 38.75,28.341 38.837,28.255 C217.2@38.837,28.245 38.837,28.235 38.433,27.832 38.433,27.232 v1(38.405,27.203)
  Bottom Layer w0.3: v1(38.405,27.203) 38.405,27.102 38.407,27.1 38.407,26.402 U9.37@38.437,26.372
VDD_PLL1: C156.2 C157.2 FB16.2 U9.40 | length 5.8
  Top Layer w0.3: C156.2@39.585,29.168 40.444,29.168 40.569,29.043 C157.2@40.569,29.038 FB16.2@41.558,29.038 ; v1(40.208,27.813) 40.237,27.842 40.362,27.842 FB16.2@41.558,29.038 ; FB16.2@41.823,29.253 41.608,29.038 FB16.2@41.558,29.038
  Bottom Layer w0.3: U9.40@39.937,26.372 39.937,27.501 40.208,27.772 v1(40.208,27.813)
VDD_PLL2CORE: C174.2 C180.2 FB19.2 U9.6 | length 4.4
  Top Layer w0.3: FB19.2@37.748,16.166 37.97,16.388 38.258,16.388 38.684,16.814 v1(38.684,16.866) 38.684,16.825 38.799,16.71 38.799,16.487 C180.2@38.919,16.367 38.979,16.426 C174.2@39.666,16.426
  Bottom Layer w0.3: U9.6@38.437,18.572 38.437,18.132 38.516,18.052 38.516,17.364 38.684,17.196 v1(38.684,16.866)
VDD_PLL2OSC: C197.2 C198.2 FB23.2 U9.4 | length 5.2
  Top Layer w0.3: v1(40.742,17.069) 40.742,16.225 FB23.2@40.8,16.167 41.1,16.467 41.839,16.467 41.882,16.51 C197.2@42.774,16.51
  Bottom Layer w0.3: U9.4@39.437,18.572 39.467,18.542 39.467,18.127 39.672,17.922 39.888,17.922 v1(40.742,17.069)
VDDO_1/2: C184.2 C190.2 FB20.2 U9.20 | length 4.1
  Top Layer w0.3: C184.2@29.87,21.807 31.213,21.807 31.354,21.666 v1(31.394,21.666)
  Bottom Layer w0.3: FB20.2@31.498,21.562 31.808,21.872 33.004,21.872 33.124,21.752 33.757,21.752 U9.20@33.787,21.722
VDDO_3/4: C201.2 C202.2 FB24.2 U9.25 | length 3.8
  Top Layer w0.3: C201.2@32.791,22.733 32.801,22.733 32.999,22.931 C202.2@33.408,22.931 ; FB24.2@33.249,25.095 33.02,24.867 v1(33.02,24.206) 33.497,23.729 33.497,23.087 C202.2@33.528,23.056
  Bottom Layer w0.3: v1(33.02,24.206) 33.028,24.214 33.779,24.214 U9.25@33.787,24.222
VDDO_5: C213.2 C214.2 FB27.2 U9.28 | length 3.3
  Top Layer w0.3: FB27.2@32.4,27.813 32.468,27.813 32.468,26.8 32.498,26.77 32.498,26.765 32.618,26.645 32.631,26.658 C213.2@33.426,26.658 v1(33.426,26.264)
  Bottom Layer w0.3: v1(33.426,26.264) 33.426,26.223 33.637,26.013 33.637,25.752 33.667,25.722 U9.28@33.787,25.722
VDDO_6: C164.2 C165.2 FB18.2 U9.43 | length 6.2
  Top Layer w0.3: v1(42.596,25.73) 42.596,28.183 43.111,28.698 43.111,28.708 C164.2@43.121,28.708 43.851,28.708 C165.2@43.874,28.732 44.866,28.732 FB18.2@45.046,28.912
  Bottom Layer w0.3: U9.43@41.587,25.722 41.591,25.726 42.592,25.726 v1(42.596,25.73)
VDDO_7/8: C193.2 C194.2 FB22.2 U9.46 | length 4.4
  Top Layer w0.3: v1(42.469,24.232) 42.509,24.232 42.566,24.288 43.464,24.288 43.764,24.588 FB22.2@43.764,24.638 43.577,24.825 C194.2@43.577,25.832 43.536,25.874 C193.2@43.536,26.568
  Bottom Layer w0.3: U9.46@41.587,24.222 41.591,24.227 42.464,24.227 v1(42.469,24.232)
VDDO_9/10: C205.2 C206.2 FB25.2 U9.51 | length 4.2
  Top Layer w0.3: v1(42.469,21.692) 43.737,21.692 FB25.2@43.743,21.698 43.553,21.888 C206.2@43.553,22.856 43.496,22.913 C205.2@43.496,23.589
  Bottom Layer w0.3: U9.51@41.587,21.722 41.602,21.707 42.454,21.707 v1(42.469,21.692)
VP3.6: C55.2 C56.2 C57.2 C58.2 C168.2 L6.2 R56.2 R109.2 U21.4 U29.1 U31.1 U31.2 U31.3 U31.15 U31.16 | length 39.9
  Top Layer w0.5: C55.2@9.075,34.512 9.095,34.492 9.095,33.888 v1(9.099,33.885) ; U21.4@10.801,62.438 10.851,62.438 10.901,62.388 10.901,62.338 10.921,62.318 v1(10.921,61.223) ; v1(34.061,34.976) 34.061,35.322 33.706,35.678 C168.2@33.715,35.687 33.715,36.941 33.909,37.135 36.155,37.135 36.337,36.953 36.337,35.417 U29.1@36.312,35.392
  Top Layer w2: L6.2@5.168,30.472 5.168,32.384
  Layer 4 w0.5: v1(9.099,33.885) 9.099,35.285 10.18,36.366 10.18,44.366 8.315,46.231 8.315,58.288 10.921,60.895 v1(10.921,61.223)
  other v1: 25.527,25.933 7.874,32.918
Vsup_ADC1: C60.2 C80.2 C81.2 R80.2 R103.1 R107.2 R108.2 U18.8 U23.1 U23.2 U23.3 U23.15 U23.16 U24.1 U24.2 U24.3 U24.15 U24.16 | length 66.2
  Top Layer w0.5: v1(1.998,6.284) 1.998,4.879 2.856,4.021 3.42,4.021 3.44,4.001 C60.2@3.44,3.996 3.452,4.008 4.388,4.008 R80.2@4.4,4.02 5.542,4.02 5.701,4.179 U18.8@5.701,4.504 ; C81.2@59.535,44.905 C81.2@59.685,44.755
  Layer 3 w0.5: v1(1.998,6.284) 1.998,65.95 v1(2.286,66.238)
  other v1: 59.715,45.339 61.468,46.812 24.054,64.262
Vsup_ADC2: C70.2 C76.2 R82.2 R106.2 R110.1 U20.8 U22.1 U22.2 U22.3 U22.15 U22.16 | length 5.7
  Top Layer w0.3: R106.2@26.982,56.49 26.982,58.048 27.658,58.724 27.753,58.724 C76.2@28.003,58.974
  Layer 3 w0.3: v1(3.734,8.687) 6.299,8.687 6.399,8.787 v1(6.439,8.787)
  other v1: 28.016,61.316
WAKE#: R23.1 R42.1 | length 10.1
  Top Layer w0.2: 35.559,-6.888 35.926,-6.521 35.926,0.187 35.662,0.452 R42.1@35.662,1.811 35.862,1.611 36.5,1.611 R23.1@36.678,1.433
pads on no net: D1.1 D1.3 D1.4 D1.6 FID1.0 FID2.0 FID3.0 FID4.0 FID5.0 FID6.0 T2.2 U1. U1.32 U1.43 U1.44 U4.7 U4.10 U4.15 U4.16 U4.21 U4.27 U5.7 U5.10 U5.15 U5.16 U5.24 U6.1 U6.2 U8.2 U8.5 U9. U9.1 U9.2 U9.3 U9.35 U9.36 U9.44 U9.45 U9.47 U9.48 U9.49 U9.50 U9.52 U9.53 U9.54 U9.55 U9.56 U10.9 U10.10 U10.12 U10.13 U11.6 U11.8 U11.11 U12.10 U12.13 U16.8 U19.2 U19.7 U21.2 U21.7 U22.8 U23.8 U24.8 U25.6 U26.2 U26.5 U27.6 U28.6 U31.8 U32.5 U32.14 U32.15 U33.4 U33.5 U33.9 U33.14 U33.15 X1.2
copper on no net:
  other v4: -14.478,108.737 -13.716,124.739

## Polygon pours and split planes (outlines as drawn)
+12V on Bottom Layer "+12V_L06_P109" (solid, pour order 109): 27.864,-8.941 27.813,-8.992 26.162,-8.992 26.162,-3.073 26.187,-3.048 27.94,-3.048 27.94,-8.89 27.864,-8.966
AGND on Bottom Layer "AGND_L06_P113" (solid, pour order 113): -0.039,-0.051 24.909,-0.051 24.909,-4.788 36.109,-4.788 36.109,-2.938 cw(c37.059,-2.938) 38.009,-2.938 38.009,-4.788 59.209,-4.788 59.209,-0.051 80.674,-0.051 80.674,127.457 -0.039,127.457
GND on Bottom Layer "GND_L06_P050" (solid, pour order 50): 45.923,9.5 54.254,17.831 63.144,17.831 67.285,22.708 67.285,23.343 67.285,35.916 68.783,35.916 69.164,36.297 71.222,36.297 73.05,34.468 80.797,34.468 80.95,34.315 80.62,33.985 80.62,-0.025 59.157,-0.025 58.979,-0.203 58.979,-4.788 45.923,-4.788
GND on Bottom Layer "Bottom Layer-GND" (solid, pour order 121): 34.163,83.058 34.214,83.109 36.551,83.109 36.551,78.511 36.398,78.359 36.266,78.491 29.43,78.491 29.43,83.058
VCC_PCA on Bottom Layer "VCC_PCA_L06_P004" (solid, pour order 4): 59.842,10.389 59.817,10.363 59.817,4.928 62.382,4.928 62.738,5.283 62.738,10.109 62.433,10.414 59.792,10.414
GND_VCXO on Bottom Layer "GND_VCXO_L06_P008" (solid, pour order 8): 74.092,29.439 77.47,29.439 77.47,26.746 76.759,26.035 73.99,26.035 73.99,29.312 74.092,29.413
GND on Bottom Layer "GND_L06_P012" (solid, pour order 12): 0.203,51.968 15.672,51.968 17.551,50.089 17.501,50.038 17.501,36.957 29.997,36.957 29.997,-4.445 35.433,-4.445 35.433,-1.981 36.093,-1.321 38.937,-1.321 38.937,-4.166 56.718,-4.166 57.633,-3.251 57.887,-3.505 59.207,-3.505 59.207,-4.445 38.176,-4.445 38.176,-2.642 37.414,-1.88 36.779,-1.88 35.916,-2.743 35.916,-4.445 24.943,-4.445 24.943,-0.051 0.203,-0.051 -0.127,0.279 -0.127,52.019
AVDD2_2.5V on Bottom Layer "AVDD2_2.5V_L06_P103" (solid, pour order 103): 42.367,39.167 43.688,39.167 cw(c43.688,38.642) 44.213,38.642 44.213,36.44 cw(c43.79,36.44) 43.79,36.017 42.342,36.017 cw(c42.342,36.347) 42.012,36.347 42.012,38.862 cw(c42.342,38.862) 42.342,39.192
DRGND on Bottom Layer "DRGND_L06_P088" (solid, pour order 88): 45.903,38.887 45.878,38.862 45.878,35.662 55.169,35.662 61.062,41.554 61.062,52.146 50.323,52.146 50.044,52.426 49.891,52.273 46.894,52.273 46.894,48.565 45.446,47.117 45.446,38.862
DVDD_1.25V on Bottom Layer "DVDD_1.25V_L06_P080" (solid, pour order 80): 46.457,47.041 45.72,47.041 45.517,47.244 45.898,47.625 45.898,48.489 46.253,48.489 46.812,49.047 46.812,49.378 47.066,49.378 48.158,50.14 48.26,48.946 47.219,47.904 46.507,47.904 46.507,47.193 46.33,47.015
AVDD2_2.5V on Bottom Layer "AVDD2_2.5V_L06_P076" (solid, pour order 76): 42.545,49.53 42.443,49.428 42.443,46.939 44.45,46.939 44.501,46.99 44.475,47.015 44.475,48.133 45.11,48.768 45.11,49.505 42.596,49.505 42.57,49.53
AVDD1_1.25V on Bottom Layer "AVDD1_1.25V_L06_P068" (solid, pour order 68): 36.5,49.116 36.5,36.627 37.389,35.738 40.411,35.738 40.411,49.116
+12V on Top Layer "+12V_L01_P018" (solid, pour order 18): 25.146,-4.496 27.889,-4.496 27.889,-8.992 27.788,-9.093 27.762,-9.068 25.171,-9.068 25.171,-4.547 25.146,-4.521
AGND on Top Layer "AGND_L01_P111" (solid, pour order 111): -0.154,0.029 24.793,0.029 24.793,-4.736 35.993,-4.736 35.993,-2.858 cw(c36.943,-2.858) 37.893,-2.858 37.893,-4.736 43.481,-4.736 43.481,58.019 80.558,58.019 80.558,127.537 -0.154,127.537
GND on Top Layer "GND_L01_P094" (solid, remove dead copper, pour order 94): 1.739,38.171 14.972,51.404 24.244,51.404 34.556,37.518 34.556,3.017 33.565,2.027 34.226,1.366 34.226,-4.298 35.521,-4.298 35.521,-1.936 35.8,-1.656 38.442,-1.656 39.652,-2.866 39.652,-4.476 57.009,-4.476 58.076,-3.409 58.94,-3.409 58.94,-4.247 59.118,-4.425 59.118,-4.788 38.264,-4.788 38.264,-2.427 37.773,-1.936 36.893,-1.936 36.434,-2.394 36.434,-4.788 25.234,-4.788 25.234,-0.259 25.285,-0.208 25.056,0.02 0.723,0.02 0.049,0.694 0.049,38.171
GND on Top Layer "GND_L01_P099" (solid, pour order 99): 55.895,17.856 63.195,17.856 67.691,22.682 67.335,23.368 67.335,35.941 68.834,35.941 69.215,36.322 71.272,36.322 73.101,34.493 80.848,34.493 81.001,34.341 80.67,34.011 80.67,0 59.207,0 59.03,-0.178 59.03,-4.788 55.895,-4.788
4610_FINE_V on Top Layer "4610_FINE_V_L01_P064" (solid, pour order 64): 34.087,15.418 43.053,15.418 43.053,13.818 42.469,13.233 34.595,13.233 34.036,13.792 34.036,15.469
GND on Top Layer "GND_L01_P101" (solid, pour order 101): 25.245,81.813 31.902,81.813 31.902,79.096 30.48,79.096 30.455,79.07 30.455,75.844 25.245,75.844
3.3V on Top Layer "3.3V_L01_P002" (solid, pour order 2): 70.282,8.915 76.733,8.915 76.733,6.426 76.683,6.375 70.282,6.375
VCC_PCA on Top Layer "VCC_PCA_L01_P010" (solid, pour order 10): 75.159,12.243 80.264,12.243 80.264,10.998 79.832,10.566 79.807,10.592 75.387,10.592 75.159,10.82
VCC_PCA on Top Layer "VCC_PCA_L01_P117" (solid, pour order 117): 59.817,10.338 59.792,10.312 59.792,4.877 62.357,4.877 62.713,5.232 62.713,10.058 62.408,10.363 59.766,10.363
Vsup_ADC1 on Top Layer "VSUP_ADC1_L01_P014" (solid, pour order 14): 58.826,46.634 58.852,46.609 58.852,45.644 58.928,45.644 59.004,45.568 59.004,43.815 61.111,43.815 ccw(c61.111,45.289) 62.154,44.247 ccw(c61.602,44.799) 62.382,44.799 62.382,45.441 cw(c62.505,45.563) 62.332,45.563 62.332,45.745 cw(c62.761,45.316) 62.761,45.923 62.978,45.923 ccw(c62.978,46.877) 63.652,46.203 cw(c63.714,46.264) 63.627,46.264 63.627,48.717 ccw(c63.075,48.165) 63.075,48.946 63.043,48.946 ccw(c63.043,48.149) 62.479,48.712 62.382,48.616 cw(c61.831,49.167) 61.831,48.387 60.198,48.387 ccw(c60.627,47.958) 60.02,47.958 60.02,47.186 cw(c59.24,47.186) 59.792,46.634
VCC_PCA on Top Layer "VCC_PCA_L01_P016" (solid, pour order 16): 24.852,38.862 27.498,38.862 27.498,38.194 28.325,38.194 28.325,37.183 28.186,37.043 28.186,36.071 26.515,36.071 26.286,35.841 26.286,35.09 25.149,35.09 24.257,35.081 24.257,38.191 24.902,38.835
AGND on Top Layer "AGND_L01_P115" (solid, pour order 115): 38.938,32.969 38.989,33.02 40.462,33.02 40.462,32.537 40.538,32.461 44.171,32.461 44.171,29.413 41.097,29.413 39.167,29.566 39.167,30.48 39.167,31.852 38.913,32.106 38.913,32.969
3.3V on Top Layer "3.3V_L01_P090" (solid, pour order 90): 71.984,26.238 72.009,26.264 73.66,26.264 73.66,29.972 73.863,30.175 78.156,30.175 78.156,26.518 76.175,24.536 71.775,24.536
NetC82_2 on Top Layer "NETC82_2_L01_P086" (solid, pour order 86): 23.927,61.087 25.095,61.087 25.095,57.582 24.867,57.353 23.089,57.353 23.089,56.464 22.631,56.007 22.581,56.058 21.666,56.058 21.666,58.75 22.022,59.106 22.022,59.919 22.708,59.919 23.901,61.112
Vsup_ADC1 on Top Layer "VSUP_ADC1_L01_P084" (solid, pour order 84): 22.2,64.897 22.149,64.846 22.149,62.332 22.327,62.154 23.724,62.154 23.724,61.163 23.876,61.011 25.121,61.011 25.121,64.364 24.587,64.897
AVDD1_SR_1.25V on Top Layer "AVDD1_SR_1.25V_L01_P074" (solid, pour order 74): 34.925,46.355 36.068,46.355 36.068,44.298 36.068,42.012 35.382,42.012 35.382,43.104 34.976,43.51 34.671,43.51 34.671,46.076 34.9,46.304
9690_AGND_SR on Top Layer "9690_AGND_SR_L01_P072" (solid, pour order 72): 25.578,48.133 25.629,48.184 25.629,49.886 31.318,49.886 35.255,45.949 35.255,42.469 30.709,42.469 25.222,47.955 25.349,47.955 25.578,48.184
NetC92_2 on Top Layer "NETC92_2_L01_P070" (solid, pour order 70): 28.499,48.362 28.499,46.99 29.312,46.177 29.312,43.561 25.883,43.561 25.197,44.247 25.197,48.031 25.527,48.362
DRGND on Top Layer "DRGND_L01_P066" (solid, pour order 66): 48.616,53.111 48.717,53.01 56.693,53.01 56.693,49.073 52.527,46.584 52.527,35.916 47.904,35.916 47.904,53.111
NetC142_2 on Top Layer "NETC142_2_L01_P060" (solid, pour order 60): 28.626,53.645 37.16,53.645 37.16,51.664 36.043,50.546 35.763,50.825 31.674,50.825 30.328,52.172 27.915,52.172 27.407,52.68 27.407,53.543 28.524,53.543
V2.5 on Top Layer "V2.5_L01_P056" (solid, pour order 56): 10.16,21.819 10.16,24.587 2.569,24.587 1.81,25.347 1.81,34.861 5.321,34.861 8.56,38.1 8.865,38.1 24.281,38.305 26.238,46.52 26.238,50.648 22.917,50.648 22.917,40.742 8.179,40.742 4.572,37.135 0.686,37.135 0.686,21.819
Vsup_ADC2 on Top Layer "VSUP_ADC2_L01_P054" (solid, pour order 54): 27.305,58.293 27.407,58.395 29.845,58.395 30.429,58.979 30.429,60.401 31.344,60.401 31.547,60.604 31.547,62.103 31.42,62.23 27.33,62.23 27.305,62.205
Vsup_ADC2 on Top Layer "VSUP_ADC2_L01_P052" (solid, pour order 52): 4.384,8.183 4.384,10.316 6.949,10.316 6.974,10.291 6.974,8.183
5V on Top Layer "5V_L01_P048" (solid, pour order 48): 14.573,3.934 7.925,3.934 7.924,5.703 12.029,5.703 12.029,7.837 14.573,7.837
V5.5 on Top Layer "V5.5_L01_P046" (solid, pour order 46): 9.76,11.76 9.76,9.438 20.601,9.438 21.768,10.871 21.768,15.443 19.533,15.443 19.126,15.85 19.126,18.821 16.307,18.821 15.85,18.364 15.85,11.836 13.36,11.836 13.284,11.76
VP3.6 on Top Layer "VP3.6_L01_P038" (solid, pour order 38): 26.289,27.864 26.289,26.594 26.391,26.492 28.042,26.492 28.042,25.679 27.661,25.298 24.909,25.806 24.446,27.864
NetC219_2 on Top Layer "NETC219_2_L01_P036" (solid, pour order 36): 26.289,27.61 25.019,27.61 25.019,29.87 26.391,31.242 27.203,31.242 27.661,31.699 27.661,32.41 29.693,32.41 29.997,32.715 30.023,32.69 31.039,32.69 31.039,31.166 30.226,30.353 29.794,30.353 29.794,29.743 28.854,28.804 26.568,28.804 26.264,28.499 26.264,27.584
VP3.6 on Top Layer "VP3.6_L01_P034" (solid, pour order 34): 2.007,34.823 2.083,34.9 10.008,34.9 10.008,29.743 9.449,29.185 9.373,29.261 1.829,29.261 1.829,34.62 2.007,34.798
V2.5 on Top Layer "V2.5_L01_P032" (solid, pour order 32): 26.01,50.648 28.727,50.648 28.727,49.911 28.753,49.886 28.499,49.632 26.01,49.632
V2.5 on Top Layer "V2.5_L01_P030" (solid, pour order 30): 9.576,40.64 9.601,40.615 19.736,40.615 19.736,37.541 19.609,37.414 17.323,37.414 17.323,38.1 16.84,38.583 9.347,38.583 9.347,40.538 9.449,40.64
V3.6 on Top Layer "V3.6_L01_P028" (solid, pour order 28): 18.567,31.826 19.888,33.147 23.063,33.147 25.044,35.128 26.086,35.128 26.086,35.001 26.543,34.544 26.543,33.909 28.651,33.909 29.083,33.477 28.575,33.147 25.298,30.048 17.882,30.048 17.831,31.14 18.491,31.801
4610_FINE_V on Top Layer "4610_FINE_V_L01_P026" (solid, pour order 26): 35.586,32.879 35.289,33.68 43.993,33.68 43.993,30.277 43.307,29.591 40.462,29.591 40.462,29.87 39.218,31.115 39.37,31.267 39.37,32.029 38.303,32.029 36.627,32.741
NetC85_2 on Top Layer "NETC85_2_L01_P022" (solid, pour order 22): 55.27,43.891 55.321,43.84 58.953,43.84 58.953,46.888 58.928,46.863 57.963,46.863 57.963,48.412 57.252,49.124 54.686,49.124 54.686,48.692 53.594,47.6 53.594,44.526 54.305,43.815 55.27,43.815
AVDD1_1.25V on Top Layer "AVDD1_1.25V_L01_P020" (solid, pour order 20): 36.551,49.479 36.5,49.428 36.5,36.627 37.389,35.738 40.411,35.738 40.411,49.581 40.259,49.733 36.551,49.733
AGND on Layer 4 "AGND_L04_P098" (solid, pour order 98): -0.039,-0.051 24.909,-0.051 24.909,-9.888 25.409,-10.388 35.609,-10.388 36.109,-9.888 36.109,-2.938 cw(c37.059,-2.938) 38.009,-2.938 38.009,-9.888 38.509,-10.388 58.709,-10.388 59.209,-9.888 59.209,-0.051 80.674,-0.051 80.674,127.457 -0.039,127.457
GND on Layer 4 "GND_L04_P092" (solid, pour order 92): 39.29,-0.873 39.19,-4.302 38.126,-4.302 37.926,-1.981 35.966,-1.981 35.966,-4.369 35.966,-4.75 30.734,-4.75 30.734,-1.118 31.09,-0.762
AVDD2_2.5V on Layer 4 "AVDD2_2.5V_L04_P062" (solid, pour order 62): 39.98,37.643 43.866,37.643 43.866,36.297 43.891,36.271 40.005,36.271
AGND on Layer 3 "AGND_L03_P096" (solid, pour order 96): -0.039,-0.051 24.909,-0.051 24.909,-9.888 25.409,-10.388 35.609,-10.388 36.109,-9.888 36.109,-2.938 cw(c37.059,-2.938) 38.009,-2.938 38.009,-9.888 38.509,-10.388 58.709,-10.388 59.209,-9.888 59.209,-0.051 80.674,-0.051 80.674,127.457 -0.039,127.457
no net on Layer 3 "Layer 3-No Net" (solid, pour order 105): 76.81,45.771
no net on Layer 5 (AGND) "Layer 5 (AGND)-No Net" (solid, pour order 123): 43.273,47.93 43.304,47.899 80.645,47.899

## Other copper
Bottom Layer:
  pour cut-out: 47.064,81.836 47.147,81.781 47.202,81.699 47.221,81.602 47.221,80.602 47.202,80.504 47.147,80.422 47.064,80.367 46.967,80.348 45.917,80.348 45.82,80.367 45.738,80.422 45.683,80.504 45.664,80.602 45.664,80.759 43.805,80.759 43.794,80.704 43.739,80.622 43.657,80.567 43.559,80.548 42.859,80.548 42.762,80.567 42.68,80.622 42.625,80.704 42.606,80.802 42.606,81.402 42.625,81.499 42.68,81.581 42.762,81.636 42.859,81.655 43.559,81.655 43.657,81.636 43.739,81.581 43.794,81.499 43.805,81.445 45.664,81.445 45.664,81.602 45.683,81.699 45.738,81.781 45.82,81.836 45.917,81.855 46.967,81.855
  pour cut-out: 46.696,95.861 46.779,95.806 46.834,95.724 46.853,95.626 46.853,94.626 46.834,94.529 46.779,94.447 46.696,94.392 46.599,94.373 45.549,94.373 45.452,94.392 45.37,94.447 45.315,94.529 45.295,94.626 45.295,94.783 44.205,94.783 44.194,94.729 44.139,94.647 44.057,94.592 43.959,94.573 43.259,94.573 43.162,94.592 43.08,94.647 43.025,94.729 43.006,94.826 43.006,95.426 43.025,95.524 43.08,95.606 43.162,95.661 43.259,95.68 43.959,95.68 44.057,95.661 44.139,95.606 44.194,95.524 44.205,95.469 45.295,95.469 45.295,95.626 45.315,95.724 45.37,95.806 45.452,95.861 45.549,95.88 46.599,95.88
  pour cut-out: 39.192,123.619 39.275,123.564 39.33,123.482 39.349,123.385 39.349,123.228 41.214,123.228 41.225,123.282 41.28,123.364 41.362,123.419 41.459,123.438 42.159,123.438 42.257,123.419 42.339,123.364 42.394,123.282 42.413,123.185 42.413,122.585 42.394,122.487 42.339,122.405 42.257,122.35 42.159,122.331 41.459,122.331 41.362,122.35 41.28,122.405 41.225,122.487 41.214,122.542 39.349,122.542 39.349,122.385 39.33,122.287 39.275,122.205 39.192,122.15 39.095,122.131 38.045,122.131 37.948,122.15 37.866,122.205 37.811,122.287 37.792,122.385 37.792,123.385 37.811,123.482 37.866,123.564 37.948,123.619 38.045,123.638 39.095,123.638
  pour cut-out: 48.588,112.951 48.671,112.896 48.726,112.814 48.745,112.717 48.745,111.717 48.726,111.619 48.671,111.537 48.588,111.482 48.491,111.463 47.441,111.463 47.344,111.482 47.262,111.537 47.207,111.619 47.188,111.717 47.188,111.874 44.205,111.874 44.194,111.819 44.139,111.737 44.057,111.682 43.959,111.663 43.259,111.663 43.162,111.682 43.08,111.737 43.025,111.819 43.006,111.917 43.006,112.517 43.025,112.614 43.08,112.696 43.162,112.751 43.259,112.77 43.959,112.77 44.057,112.751 44.139,112.696 44.194,112.614 44.205,112.56 47.188,112.56 47.188,112.717 47.207,112.814 47.262,112.896 47.344,112.951 47.441,112.97 48.491,112.97
  pour cut-out: 48.588,118.158 48.671,118.103 48.726,118.021 48.745,117.924 48.745,116.924 48.726,116.826 48.671,116.744 48.588,116.689 48.491,116.67 47.441,116.67 47.344,116.689 47.262,116.744 47.207,116.826 47.188,116.924 47.188,117.081 44.212,117.081 44.201,117.026 44.146,116.944 44.064,116.889 43.967,116.87 43.267,116.87 43.17,116.889 43.087,116.944 43.032,117.026 43.013,117.124 43.013,117.724 43.032,117.821 43.087,117.903 43.17,117.958 43.267,117.977 43.967,117.977 44.064,117.958 44.146,117.903 44.201,117.821 44.212,117.767 47.188,117.767 47.188,117.924 47.207,118.021 47.262,118.103 47.344,118.158 47.441,118.177 48.491,118.177